# Altium PCB MiniPC.PcbDoc (part 15 of 24)
Units mm, origin at the board's own origin, x right, y up, seen from the top; angles counter-clockwise.
Board outline 175 x 155 mm, 16 copper layers (1_Top, 2_int1_(gnd), 3_int2_(power), 4_int3_(gnd), 5_int4_(sign), 6_int5_(power), 7_int6_(sign), 8_int7_(power), 9_int8_(gnd), 10_int9_(sign), 11_int10_(gnd), 12_int11_(sign), 13_int12_(gnd), 14_int13_(power), 15_int14_(gnd), 16_Bottom), stack 2.008 mm thick; 1046 components, 837 nets, 6010 pads, 4009 vias.
Unrouted connection lines stored in the file: 564.
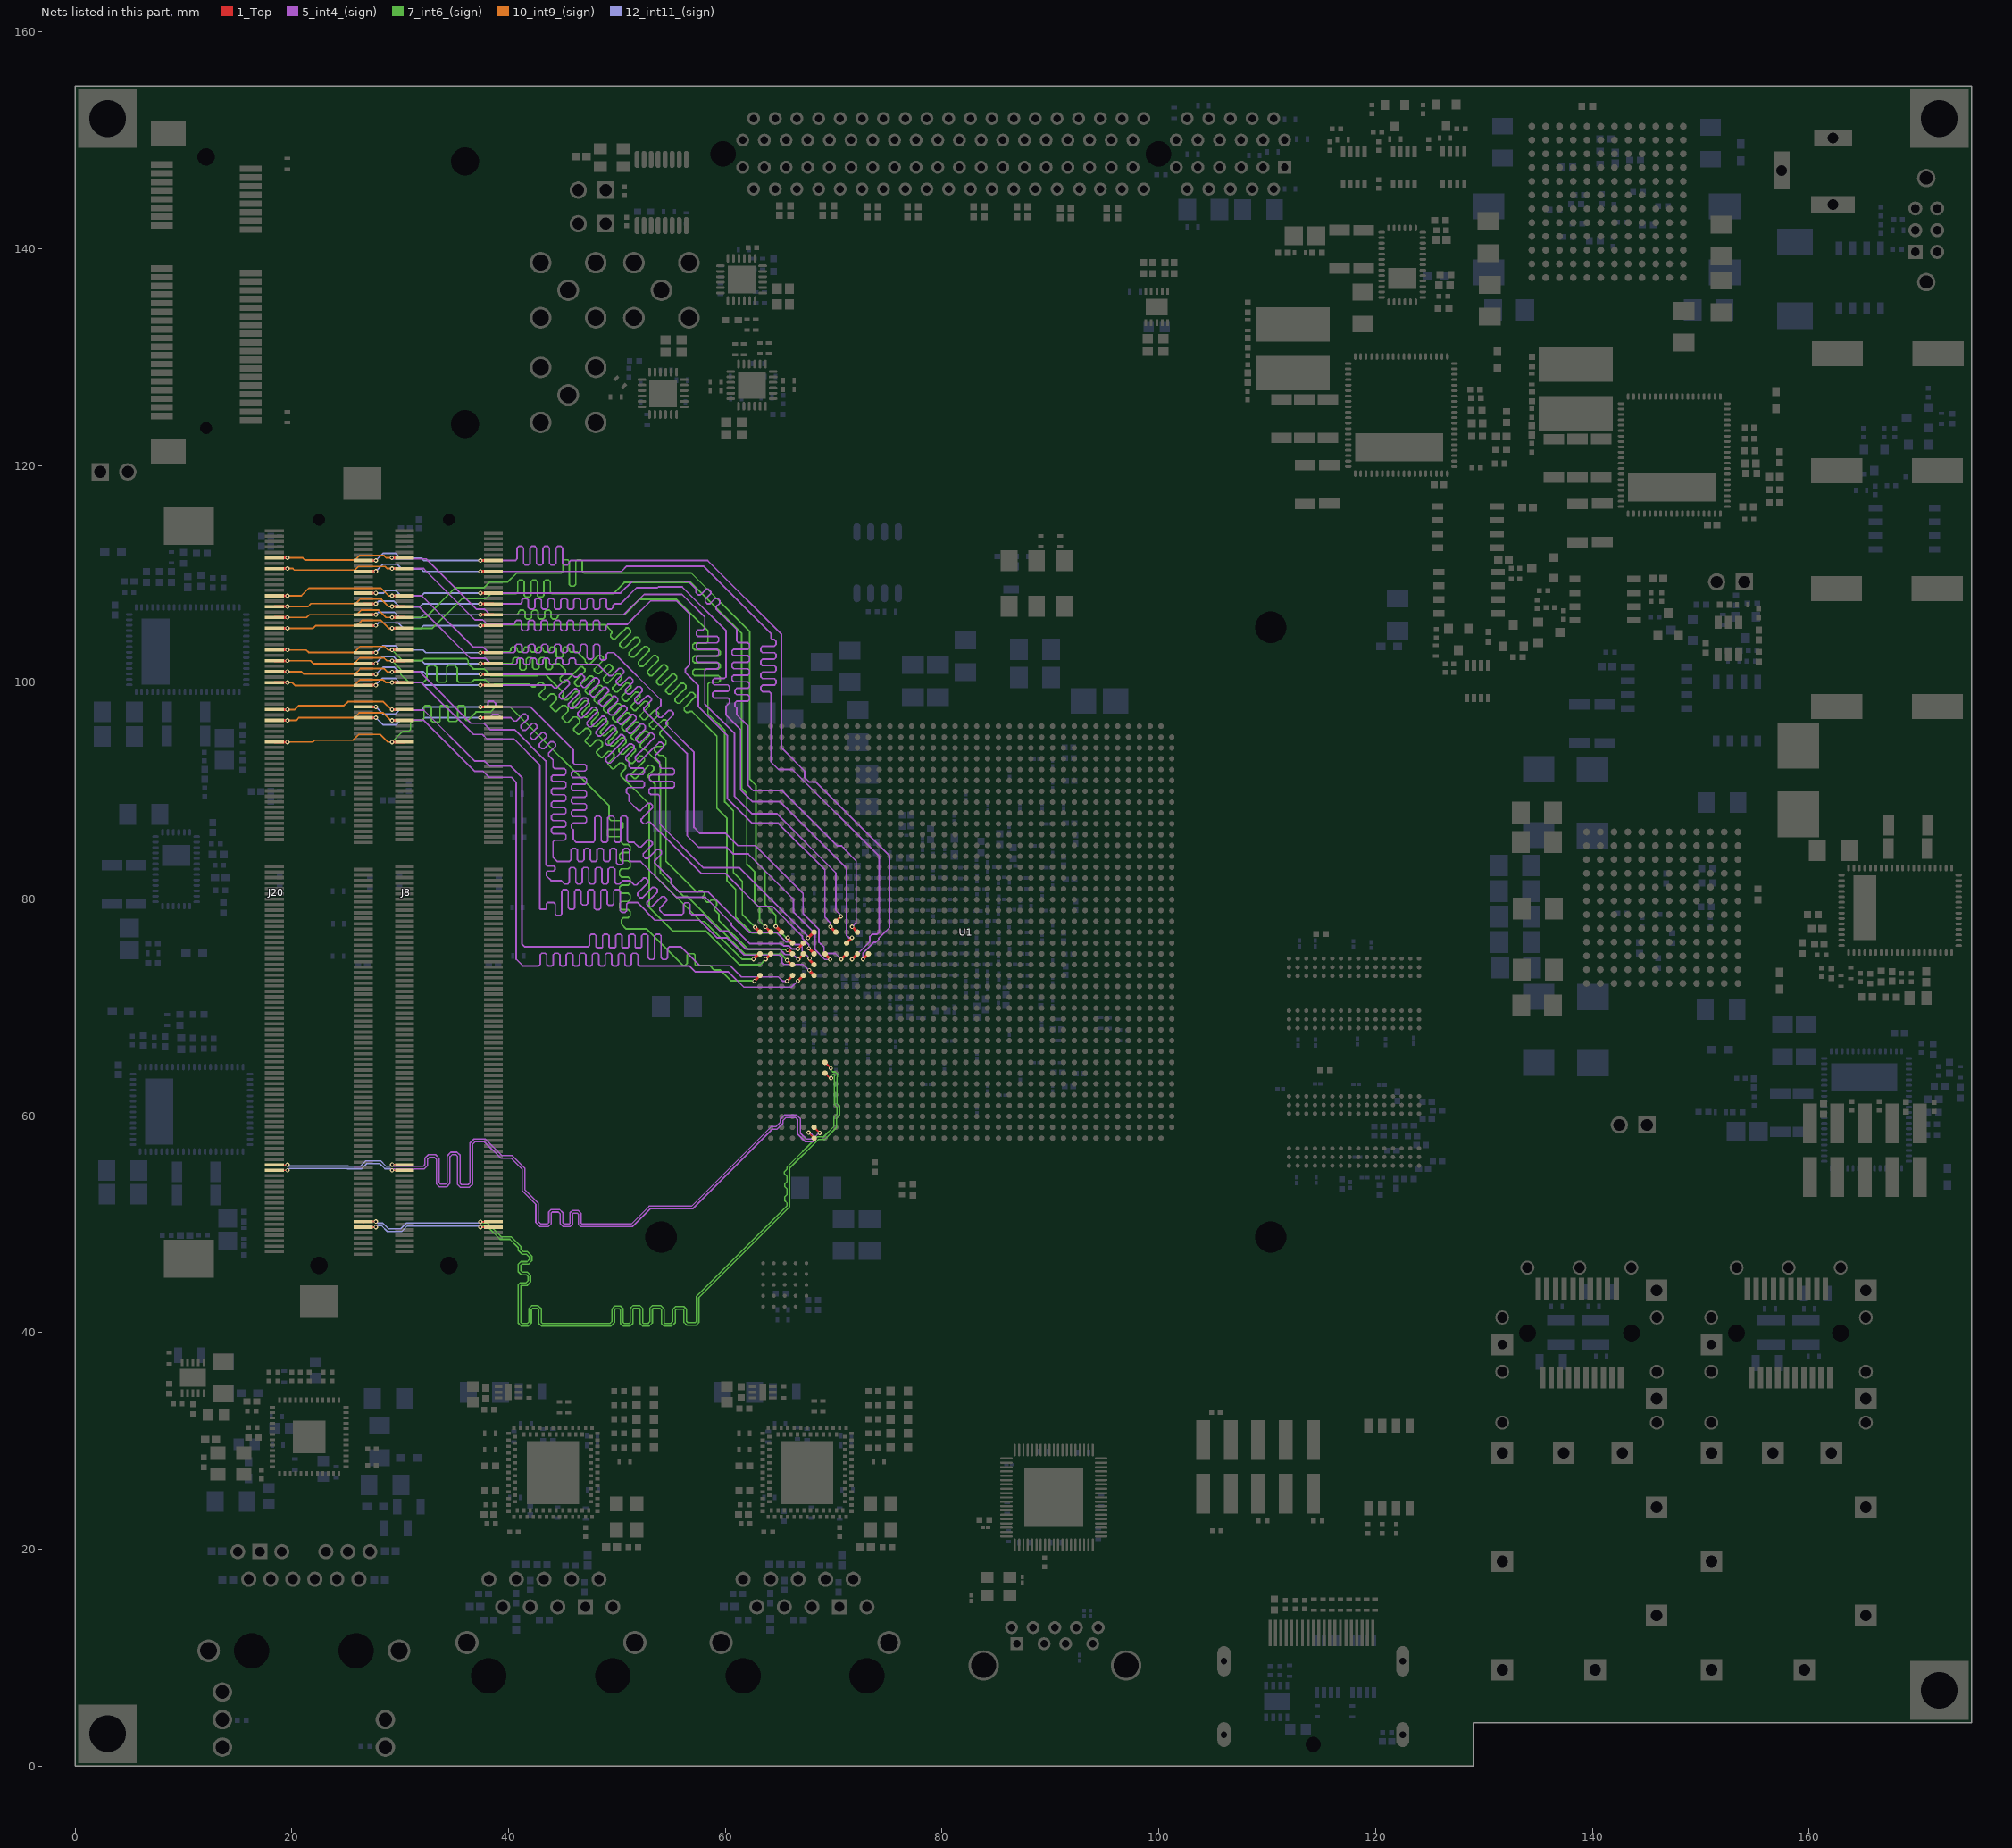
[diagram p27: the nets of this part, all layers, seen from the top]

## Via types
v1: diameter 0.4, hole 0.2, 1_Top to 16_Bottom, tented both sides, 1658 vias
v2: diameter 0.5, hole 0.2, 1_Top to 16_Bottom, tented both sides, 1014 vias
v3: diameter 0.7, hole 0.3, 1_Top to 16_Bottom, tented both sides, 915 vias
v4: diameter 0.6, hole 0.2, 1_Top to 16_Bottom, tented both sides, 278 vias
v5: diameter 0.4, hole 0.2, 1_Top to 16_Bottom, 93 vias
v6: diameter 0.4/0/0/0/0/0/0/0/0/0/0/0/0/0/0/0.4 (per signal layer), hole 0.2, 1_Top to 16_Bottom, tented both sides, 18 vias
v7: diameter 0.4/0/0/0/0/0/0/0/0/0/0/0.4/0.4/0.4/0.4/0.4 (per signal layer), hole 0.2, 1_Top to 16_Bottom, tented both sides, 16 vias
v8: diameter 0.5, hole 0.254, 1_Top to 16_Bottom, tented both sides, 15 vias
v9: diameter 0.5, hole 0.2, 1_Top to 16_Bottom, 2 vias

## Nets (pads, with @x,y where several pads share a name; then routed paths per layer and width w, separated by ;. In a path a pad name is that pad's centre, name@x,y a point inside that pad or via, vN(x,y) a via of type N, cw(c..) or ccw(c..) an arc to the next point about the centre after c; other vN are vias at no path point) (continued)
DDR4_SODIMM_DQ39: J8.182 J20.182 U1.AD1 | length 84.7
  1_Top w0.25: J20.182@18.4,94.475 v1(19.602,94.475) ; v1(29.25,94.475) J8.182@30.4,94.475 ; v1(62.675,72.425) 62.68,72.425 U1.AD1@63.194,72.939
  7_int6_(sign) w0.15: v1(29.25,94.475) 30.225,95.45 30.77,95.45 30.95,95.63 30.95,96.2 31.225,96.475 32,96.475 32.2,96.675 32.2,97.75 32.3,97.85 32.75,97.85 32.875,97.725 32.875,96.45 33,96.325 33.6,96.325 33.675,96.4 33.675,97.775 33.75,97.85 34.325,97.85 34.45,97.725 34.45,96.475 34.55,96.375 35.175,96.375 35.3,96.5 35.3,97.75 35.4,97.85 35.85,97.85 36,97.7 36,96.575 36.1,96.475 36.225,96.475 37,97.25 38.325,97.25 38.8,97.725 40.125,97.725 49.275,88.575 49.275,87.4 49.45,87.225 50.325,87.225 50.55,87 50.55,86.625 50.35,86.425 49.2,86.425 49.15,86.375 49.15,85.85 49.25,85.75 50.325,85.75 50.425,85.65 50.425,85.213 50.612,85.025 51.038,85.025 51.225,84.838 51.225,84.463 51.038,84.275 50.418,84.275 50.23,84.088 50.23,83.713 50.418,83.525 51.038,83.525 51.225,83.338 51.225,82.963 51.038,82.775 50.418,82.775 50.23,82.588 50.23,82.213 50.418,82.025 51.038,82.025 51.225,81.838 51.225,81.463 51.038,81.275 50.418,81.275 50.23,81.088 50.23,80.713 50.418,80.525 51.038,80.525 51.225,80.338 51.225,79.963 51.038,79.775 50.418,79.775 50.23,79.588 50.23,79.213 50.418,79.025 51.038,79.025 51.225,78.838 51.225,78.463 51.038,78.275 50.612,78.275 50.425,78.088 50.425,77.675 50.865,77.235 52.74,77.235 56.1,73.875 56.3,73.875 56.475,74.05 56.475,74.85 56.575,74.95 57.075,74.95 57.2,74.825 57.2,73.975 57.3,73.875 58.553,73.875 58.988,73.44 59.531,73.44 60.521,72.45 62.65,72.45 v1(62.675,72.425)
  10_int9_(sign) w0.15: v1(19.602,94.475) 21.925,94.475 22.1,94.65 25.65,94.65 26.175,95.175 28.15,95.175 28.85,94.475 v1(29.25,94.475)
DDR4_SODIMM_DQ40: J8.195 J20.195 U1.AC6 | length 89.3
  1_Top w0.25: J20.195@26.6,97.725 v1(27.75,97.725) ; v1(37.398,97.725) J8.195@38.6,97.725 ; v1(67.778,74.504) 67.778,74.355 U1.AC6@68.194,73.939
  5_int4_(sign) w0.15: v1(37.398,97.725) 37.95,97.725 37.95,97.75 38.1,97.9 38.1,98.165 38.185,98.25 38.6,98.25 38.8,98.05 38.8,97.8 38.875,97.725 42,97.725 45.985,93.74 45.985,92.55 46.135,92.4 47.035,92.4 47.185,92.25 47.185,91.95 47.035,91.8 45.96,91.8 45.81,91.65 45.81,91.35 45.96,91.2 47.035,91.2 47.185,91.05 47.185,90.75 47.035,90.6 45.96,90.6 45.81,90.45 45.81,90.15 45.96,90 47.035,90 47.185,89.85 47.185,89.55 47.035,89.4 45.96,89.4 45.81,89.25 45.81,88.95 45.96,88.8 47.035,88.8 47.185,88.65 47.185,88.35 47.035,88.2 45.96,88.2 45.81,88.05 45.81,87.75 45.96,87.6 47.035,87.6 47.185,87.45 47.185,87.15 47.035,87 45.96,87 45.81,86.85 45.81,86.55 45.985,86.375 45.985,85.49 46.25,85.225 47.8,85.225 47.95,85.375 47.95,87.5 48.1,87.65 48.4,87.65 48.55,87.5 48.55,85.375 48.7,85.225 49,85.225 49.15,85.375 49.15,87.5 49.3,87.65 49.6,87.65 49.75,87.5 49.75,85.375 49.9,85.225 50.2,85.225 50.35,85.375 50.35,87.5 50.5,87.65 50.8,87.65 50.95,87.5 50.95,85.375 51.1,85.225 51.575,85.225 51.994,84.806 52.206,84.806 52.833,85.434 53.045,85.434 53.257,85.222 53.257,85.009 52.524,84.276 52.414,84.166 52.414,83.954 52.626,83.742 52.838,83.742 53.682,84.585 53.894,84.585 54.106,84.373 54.106,84.161 53.478,83.534 53.478,83.322 54.975,81.825 54.975,81.424 55.734,80.665 57.022,80.665 58.41,80.665 61.309,77.766 61.35,77.766 62.225,76.891 64.739,76.891 65.591,76.04 66.228,76.04 66.479,75.788 66.856,75.788 67.088,75.556 67.088,75.212 67.778,74.522 v1(67.778,74.504)
  12_int11_(sign) w0.15: v1(27.75,97.725) 28.4,97.075 29.55,97.075 29.925,97.45 32,97.45 32.275,97.725 v1(37.398,97.725)
DDR4_SODIMM_DQ41: J8.194 J20.194 U1.AD4 | length 86.4
  1_Top w0.25: J20.194@18.4,97.475 v1(19.602,97.475) ; v1(29.25,97.475) J8.194@30.4,97.475 ; v1(65.7,72.425) 66.194,72.919 U1.AD4@66.194,72.939
  5_int4_(sign) w0.15: v1(29.25,97.475) 29.3,97.425 32.175,97.425 36.875,92.725 37.8,92.725 38.275,92.25 40.2,92.25 41.225,91.225 41.225,75.85 41.49,75.585 47.325,75.585 47.475,75.735 47.475,76.595 47.625,76.745 47.925,76.745 48.075,76.595 48.075,75.585 48.151,75.509 48.599,75.509 48.675,75.585 48.675,76.595 48.825,76.745 49.125,76.745 49.275,76.595 49.275,75.585 49.351,75.509 49.799,75.509 49.875,75.585 49.875,76.595 50.025,76.745 50.325,76.745 50.475,76.595 50.475,75.585 50.551,75.509 50.999,75.509 51.075,75.585 51.075,76.595 51.225,76.745 51.525,76.745 51.675,76.595 51.675,75.585 51.751,75.509 52.199,75.509 52.275,75.585 52.275,76.595 52.425,76.745 52.725,76.745 52.875,76.595 52.875,74.575 53.025,74.425 53.325,74.425 53.475,74.575 53.475,76.595 53.625,76.745 53.925,76.745 54.075,76.595 54.075,74.575 54.225,74.425 54.525,74.425 54.675,74.575 54.675,75.435 54.825,75.585 55.915,75.585 57.665,73.835 60.458,73.835 61.483,72.81 64.884,72.81 65.269,72.425 v1(65.7,72.425)
  10_int9_(sign) w0.15: v1(19.602,97.475) 20.275,97.475 20.65,97.85 24.825,97.85 25.175,98.2 28.45,98.2 29.175,97.475 v1(29.25,97.475)
DDR4_SODIMM_DQ42: J8.207 J20.207 U1.Y6 | length 90.8
  1_Top w0.25: J20.207@26.6,100.725 v1(27.75,100.725) ; v1(37.425,100.725) J8.207@38.6,100.725 ; v1(67.625,76.4) 68.164,76.939 U1.Y6@68.194,76.939
  5_int4_(sign) w0.15: v1(37.425,100.725) 45.85,100.725 46.106,100.469 46.318,100.469 46.574,100.725 46.786,100.725 46.999,100.513 46.999,100.301 46.636,99.939 46.636,99.765 46.887,99.514 47.061,99.514 47.945,100.398 48.157,100.398 48.369,100.186 48.369,99.974 47.485,99.09 47.485,98.916 47.735,98.666 47.909,98.666 48.793,99.55 49.005,99.55 49.217,99.338 49.217,99.125 48.333,98.242 48.333,98.068 48.584,97.817 48.758,97.817 49.642,98.701 49.854,98.701 50.066,98.489 50.066,98.277 49.182,97.393 49.182,97.219 49.432,96.969 49.606,96.969 50.49,97.853 50.702,97.853 50.914,97.641 50.914,97.428 50.03,96.545 50.03,96.371 50.281,96.12 50.455,96.12 51.339,97.004 51.551,97.004 51.763,96.792 51.763,96.58 50.879,95.696 50.879,95.522 51.129,95.272 51.303,95.272 52.187,96.156 52.399,96.156 52.611,95.943 52.611,95.731 51.728,94.847 51.728,94.674 51.978,94.423 52.152,94.423 53.036,95.307 53.248,95.307 53.46,95.095 53.46,94.883 52.576,93.999 51.692,93.115 51.692,92.903 51.904,92.691 52.116,92.691 53,93.575 53.884,94.459 54.096,94.459 54.308,94.246 54.308,94.034 53.531,93.256 53.531,93.044 53.95,92.625 53.95,92.2 54.1,92.05 55.155,92.05 55.305,91.9 55.305,91.6 55.155,91.45 53.149,91.45 52.999,91.3 52.999,91 53.149,90.85 55.155,90.85 55.305,90.7 55.305,90.4 55.155,90.25 53.113,90.25 52.963,90.1 52.963,89.8 53.113,89.65 53.8,89.65 53.95,89.5 53.95,86.921 57.996,82.875 61.325,82.875 67.625,76.575 v1(67.625,76.4)
  12_int11_(sign) w0.15: v1(27.75,100.725) 28.4,101.375 29.475,101.375 29.875,100.975 32.125,100.975 32.375,100.725 v1(37.425,100.725)
DDR4_SODIMM_DQ43: J8.208 J20.208 U1.AB5 | length 89.9
  1_Top w0.25: J20.208@18.4,100.975 v1(19.602,100.975) ; v1(29.25,100.95) 29.275,100.975 J8.208@30.4,100.975 ; v1(66.725,74.425) 67.194,74.894 U1.AB5@67.194,74.939
  5_int4_(sign) w0.15: v1(29.25,100.95) 29.275,100.975 31.775,100.975 36.535,96.215 37.71,96.215 38.3,95.625 40.55,95.625 43.45,92.725 43.45,83.15 43.55,83.05 44.15,83.05 44.275,82.925 44.275,82.7 44.15,82.575 43.6,82.575 43.5,82.475 43.5,82.125 43.925,81.7 44.85,81.7 45,81.55 45,81.535 45.15,81.385 45.45,81.385 45.6,81.535 45.6,82.75 45.75,82.9 46.05,82.9 46.2,82.75 46.2,81.535 46.35,81.385 46.65,81.385 46.8,81.535 46.8,82.75 46.95,82.9 47.25,82.9 47.4,82.75 47.4,81.535 47.55,81.385 47.85,81.385 48,81.535 48,82.75 48.15,82.9 48.45,82.9 48.6,82.75 48.6,81.535 48.75,81.385 49.05,81.385 49.2,81.535 49.2,82.75 49.35,82.9 49.65,82.9 49.8,82.75 49.8,81.535 49.95,81.385 50.25,81.385 50.4,81.535 50.4,81.55 50.55,81.7 51.2,81.7 51.606,81.294 51.818,81.294 52.455,81.93 52.667,81.93 52.879,81.718 52.879,81.506 51.915,80.542 51.915,80.33 52.127,80.118 52.339,80.118 53.303,81.082 53.515,81.082 53.727,80.87 53.727,80.658 52.985,79.915 52.777,79.707 52.777,79.495 52.989,79.282 53.201,79.282 53.409,79.491 54.152,80.233 54.364,80.233 54.576,80.021 54.576,79.809 53.94,79.173 53.94,78.96 54.338,78.562 56,78.562 56.15,78.712 56.15,79.495 56.3,79.645 56.6,79.645 56.75,79.495 56.75,78.712 56.9,78.562 57.988,78.562 59.525,77.025 60.25,77.025 61.9,75.375 65.021,75.375 65.521,74.875 66.25,74.875 66.7,74.425 v1(66.725,74.425)
  10_int9_(sign) w0.15: v1(19.602,100.975) 20.875,100.975 21.1,100.75 25.825,100.75 26.325,101.25 28.525,101.25 28.825,100.95 v1(29.25,100.95)
DDR4_SODIMM_DQ44: J8.191 J20.191 U1.AA5 | length 89.8
  1_Top w0.25: J20.191@26.6,96.725 v1(27.75,96.725) ; v1(37.398,96.725) J8.191@38.6,96.725 ; v1(66.7,75.4) 67.194,75.894 U1.AA5@67.194,75.939
  5_int4_(sign) w0.15: v1(37.398,96.725) 38.25,96.725 38.55,97.025 39.05,97.025 39.35,96.725 40.2,96.725 40.506,96.419 40.718,96.419 41.355,97.055 41.567,97.055 41.779,96.843 41.779,96.631 41.142,95.995 41.142,95.783 41.355,95.57 41.567,95.57 42.203,96.207 42.415,96.207 42.627,95.995 42.627,95.783 41.991,95.146 41.991,94.934 42.203,94.722 42.415,94.722 43.052,95.358 43.264,95.358 43.476,95.146 43.476,94.934 42.84,94.298 42.84,94.085 43.052,93.873 43.264,93.873 43.9,94.51 44.112,94.51 44.324,94.298 44.324,94.085 43.688,93.449 43.688,93.237 44.1,92.825 44.1,92.175 44.25,92.025 45.15,92.025 45.3,91.875 45.3,91.575 45.15,91.425 44.1,91.425 43.96,91.285 43.96,90.965 44.1,90.825 45.15,90.825 45.3,90.675 45.3,90.375 45.15,90.225 44.1,90.225 43.96,90.085 43.96,89.765 44.1,89.625 45.15,89.625 45.3,89.475 45.3,89.175 45.15,89.025 44.1,89.025 43.96,88.885 43.96,88.565 44.1,88.425 45.15,88.425 45.3,88.275 45.3,87.975 45.15,87.825 44.1,87.825 43.96,87.685 43.96,87.365 44.1,87.225 45.15,87.225 45.3,87.075 45.3,86.775 45.15,86.625 44.1,86.625 43.96,86.485 43.96,86.165 44.1,86.025 45.15,86.025 45.3,85.875 45.3,85.575 45.15,85.425 44.25,85.425 44.1,85.275 44.1,83.85 44.5,83.45 45.6,83.45 45.75,83.6 45.75,84.5 45.9,84.65 46.2,84.65 46.35,84.5 46.35,83.6 46.5,83.45 46.8,83.45 46.95,83.6 46.95,84.5 47.1,84.65 47.4,84.65 47.55,84.5 47.55,83.6 47.7,83.45 48,83.45 48.15,83.6 48.15,84.5 48.3,84.65 48.6,84.65 48.75,84.5 48.75,83.6 48.9,83.45 49.2,83.45 49.35,83.6 49.35,84.5 49.5,84.65 49.8,84.65 49.95,84.5 49.95,83.321 50.1,83.171 50.4,83.171 50.55,83.321 50.55,84.5 50.7,84.65 51,84.65 51.15,84.5 51.15,83.6 51.3,83.45 52.196,83.45 55.491,80.155 56.089,80.155 56.811,80.155 58.17,80.155 60.55,77.775 60.55,77.575 62.25,75.875 65.176,75.875 65.381,75.67 65.881,75.67 66.151,75.4 v1(66.7,75.4)
  12_int11_(sign) w0.15: v1(27.75,96.725) 28.4,96.075 29.625,96.075 30.025,96.475 32.025,96.475 32.275,96.725 v1(37.398,96.725)
DDR4_SODIMM_DQ45: J8.190 J20.190 U1.AD5 | length 86.6
  1_Top w0.25: J20.190@18.4,96.475 v1(19.602,96.475) ; v1(29.25,96.475) J8.190@30.4,96.475 ; v1(66.694,72.439) U1.AD5@67.194,72.939
  5_int4_(sign) w0.15: v1(29.25,96.475) 29.275,96.5 32.15,96.5 36.875,91.775 37.65,91.775 38.2,91.225 40.25,91.225 40.7,90.775 40.7,74.45 41.319,73.831 42.775,73.831 42.925,73.981 42.925,74.849 43.075,74.999 43.375,74.999 43.525,74.849 43.525,73.981 43.675,73.831 43.975,73.831 44.125,73.981 44.125,74.849 44.275,74.999 44.575,74.999 44.725,74.849 44.725,73.981 44.875,73.831 45.175,73.831 45.325,73.981 45.325,74.849 45.475,74.999 45.775,74.999 45.925,74.849 45.925,73.981 46.075,73.831 46.375,73.831 46.525,73.981 46.525,74.849 46.675,74.999 46.975,74.999 47.125,74.849 47.125,73.981 47.275,73.831 47.575,73.831 47.725,73.981 47.725,74.849 47.875,74.999 48.175,74.999 48.325,74.849 48.325,73.981 48.475,73.831 48.775,73.831 48.925,73.981 48.925,74.849 49.075,74.999 49.375,74.999 49.525,74.849 49.525,73.981 49.675,73.831 49.975,73.831 50.125,73.981 50.125,74.849 50.275,74.999 50.575,74.999 50.725,74.849 50.725,73.981 50.875,73.831 51.175,73.831 51.325,73.981 51.325,74.849 51.475,74.999 51.775,74.999 51.925,74.849 51.925,73.981 52.075,73.831 56.669,73.831 57.223,73.277 60.296,73.277 61.712,71.86 66.115,71.86 v1(66.694,72.439)
  10_int9_(sign) w0.15: v1(19.602,96.475) 20.4,96.475 20.65,96.725 25.75,96.725 26.2,97.175 28.45,97.175 29.15,96.475 v1(29.25,96.475)
DDR4_SODIMM_DQ46: J8.203 J20.203 U1.AB6 | length 90.2
  1_Top w0.25: J20.203@26.6,99.725 v1(27.75,99.725) ; v1(37.398,99.725) J8.203@38.6,99.725 ; v1(67.7,75.45) 68.194,74.956 U1.AB6@68.194,74.939
  5_int4_(sign) w0.15: v1(37.398,99.725) 43.975,99.725 44.231,99.469 44.443,99.469 45.189,100.215 45.401,100.215 45.614,100.003 45.614,99.791 44.682,98.859 44.682,98.647 44.894,98.435 45.106,98.435 46.07,99.398 46.282,99.398 46.494,99.186 46.494,98.974 45.61,98.09 45.53,98.011 45.53,97.798 45.743,97.586 45.955,97.586 46.034,97.666 46.918,98.55 47.13,98.55 47.342,98.338 47.342,98.125 46.458,97.242 46.379,97.162 46.379,96.95 46.591,96.738 46.803,96.738 47.767,97.701 47.979,97.701 48.191,97.489 48.191,97.277 47.307,96.393 47.227,96.314 47.227,96.101 47.44,95.889 47.652,95.889 47.731,95.969 48.615,96.853 48.827,96.853 49.039,96.641 49.039,96.428 48.155,95.545 48.076,95.465 48.076,95.253 48.288,95.041 48.5,95.041 49.464,96.004 49.676,96.004 49.888,95.792 49.888,95.58 49.004,94.696 48.925,94.616 48.925,94.404 49.137,94.192 49.349,94.192 49.428,94.272 50.312,95.156 50.524,95.156 50.736,94.943 50.736,94.731 49.853,93.847 48.969,92.964 48.969,92.751 49.181,92.539 49.393,92.539 51.161,94.307 51.373,94.307 51.585,94.095 51.585,93.883 50.807,93.105 50.807,92.893 51.125,92.575 51.125,92.225 51.275,92.075 52.375,92.075 52.525,91.925 52.525,91.625 52.375,91.475 51.02,91.475 50.87,91.325 50.87,91.025 51.02,90.875 52.375,90.875 52.525,90.725 52.525,90.425 52.375,90.275 51.02,90.275 50.87,90.125 50.87,89.825 51.125,89.57 51.125,89.025 51.981,88.169 52.193,88.169 52.86,88.835 53.072,88.835 53.284,88.623 53.284,88.411 52.511,87.639 52.243,87.371 52.243,87.158 52.456,86.946 52.668,86.946 52.83,87.108 53.042,87.108 57.785,82.365 59.985,82.365 63.05,79.3 64.369,79.3 67.095,76.574 67.095,76.38 67.7,75.775 v1(67.7,75.45)
  12_int11_(sign) w0.15: v1(27.75,99.725) 27.75,99.775 28.325,100.35 29.575,100.35 29.95,99.975 31.975,99.975 32.225,99.725 v1(37.398,99.725)
DDR4_SODIMM_DQ47: J8.204 J20.204 U1.AD6 | length 89
  1_Top w0.25: J20.204@18.4,99.975 v1(19.602,99.975) ; v1(29.25,99.975) J8.204@30.4,99.975 ; v1(67.75,73.425) 67.75,73.383 U1.AD6@68.194,72.939
  5_int4_(sign) w0.15: v1(29.25,99.975) 31.95,99.975 36.75,95.175 37.6,95.175 38.025,94.75 40.5,94.75 42.875,92.375 42.875,79.125 42.95,79.05 43.4,79.05 43.475,79.125 43.475,79.525 43.625,79.675 44.15,79.675 44.3,79.525 44.3,78.625 44.45,78.475 44.75,78.475 44.9,78.625 44.9,80.725 45.05,80.875 45.35,80.875 45.5,80.725 45.5,79.196 45.65,79.046 45.95,79.046 46.1,79.196 46.1,80.725 46.25,80.875 46.55,80.875 46.7,80.725 46.7,79.59 46.85,79.44 47.15,79.44 47.3,79.59 47.3,80.725 47.45,80.875 47.75,80.875 47.9,80.725 47.9,79.171 48.05,79.021 48.35,79.021 48.5,79.171 48.5,80.725 48.65,80.875 48.95,80.875 49.1,80.725 49.1,79.565 49.25,79.415 49.55,79.415 49.7,79.565 49.7,80.725 49.85,80.875 50.15,80.875 50.3,80.725 50.3,78.921 50.45,78.771 50.75,78.771 50.9,78.921 50.9,79.525 51.05,79.675 51.875,79.675 53.498,78.052 57.598,78.052 59.225,76.425 60.125,76.425 61.715,74.835 64.965,74.835 65.2,74.6 65.2,74.175 65.41,73.965 67.148,73.965 67.688,73.425 v1(67.75,73.425)
  10_int9_(sign) w0.15: v1(19.602,99.975) 20.025,99.975 20.3,99.7 25.75,99.7 26.275,100.225 28.45,100.225 28.7,99.975 v1(29.25,99.975)
DDR4_SODIMM_DQ48: J8.216 J20.216 U1.AB1 | length 84.7
  1_Top w0.25: J20.216@18.4,102.975 v1(19.602,102.975) ; v1(29.25,102.975) J8.216@30.4,102.975 ; v1(62.6,74.45) 63.089,74.939 U1.AB1@63.194,74.939
  7_int6_(sign) w0.15: v1(29.25,102.975) 30.225,102 32.05,102 32.225,102.175 36.1,102.175 36.275,102 36.275,101.7 36.75,101.225 37.75,101.225 38.365,100.61 42.644,100.61 42.724,100.69 43.412,100.69 45.048,99.054 45.048,98.842 44.993,98.787 44.993,98.575 45.205,98.363 45.417,98.363 45.578,98.524 46.179,99.125 46.391,99.125 46.604,98.913 46.604,98.701 45.935,98.032 45.935,97.82 46.148,97.608 46.36,97.608 47.028,98.276 47.24,98.276 47.452,98.064 47.452,97.852 46.801,97.201 46.801,96.989 47.013,96.777 47.226,96.777 47.876,97.428 48.089,97.428 48.301,97.216 48.301,97.004 47.65,96.353 47.65,96.141 47.862,95.929 48.074,95.929 48.124,95.978 48.725,96.579 48.937,96.579 49.149,96.367 49.149,96.155 48.495,95.501 48.495,95.289 48.707,95.077 48.919,95.077 49.573,95.731 49.786,95.731 49.998,95.519 49.998,95.307 49.397,94.706 49.236,94.545 49.236,94.333 49.448,94.12 49.66,94.12 49.821,94.281 50.422,94.882 50.634,94.882 50.846,94.67 50.846,94.458 50.178,93.79 50.178,93.578 50.39,93.366 50.602,93.366 51.27,94.034 51.483,94.034 51.695,93.822 51.695,93.609 51.044,92.959 51.044,92.747 51.256,92.534 51.468,92.534 51.518,92.584 52.119,93.185 52.331,93.185 52.543,92.973 52.543,92.761 51.341,91.559 51.341,91.347 51.553,91.135 51.765,91.135 52.968,92.337 53.18,92.337 53.392,92.125 53.392,91.912 52.897,91.417 52.897,91.205 53.5,90.602 53.5,82.178 57.755,77.922 58.05,77.922 61.522,74.45 v1(62.6,74.45)
  10_int9_(sign) w0.15: v1(19.602,102.975) 21.325,102.975 21.55,102.75 25.75,102.75 26.3,103.3 28.55,103.3 28.875,102.975 v1(29.25,102.975)
DDR4_SODIMM_DQ49: J8.215 J20.215 U1.AB4 | length 87.2
  1_Top w0.25: J20.215@26.6,102.725 26.625,102.7 26.655,102.73 v1(27.751,102.73) ; v1(37.398,102.725) J8.215@38.6,102.725 ; v1(65.728,75.279) 65.855,75.279 U1.AB4@66.194,74.939
  7_int6_(sign) w0.15: v1(37.398,102.725) 37.448,102.775 40.05,102.775 40.2,102.925 40.2,103.1 40.35,103.25 40.65,103.25 40.8,103.1 40.8,102.925 40.95,102.775 41.25,102.775 41.4,102.925 41.4,103.1 41.55,103.25 41.85,103.25 42,103.1 42,102.925 42.15,102.775 42.45,102.775 42.6,102.925 42.6,103.1 42.75,103.25 43.05,103.25 43.2,103.1 43.2,102.925 43.35,102.775 43.65,102.775 43.8,102.925 43.8,103.1 43.95,103.25 44.25,103.25 44.4,103.1 44.4,102.385 44.55,102.235 44.85,102.235 45,102.385 45,103.1 45.15,103.25 45.45,103.25 45.6,103.1 45.6,102.925 45.75,102.775 46.35,102.775 47.061,102.064 47.061,101.904 47.326,101.639 47.486,101.639 48.314,102.468 48.526,102.468 48.738,102.256 48.738,102.043 47.91,101.215 47.91,101.055 48.174,100.791 48.334,100.791 49.163,101.619 49.375,101.619 49.587,101.407 49.587,101.195 48.758,100.367 48.758,100.207 49.023,99.942 49.183,99.942 50.011,100.771 50.223,100.771 50.435,100.559 50.435,100.346 49.607,99.518 49.607,99.358 49.871,99.094 50.031,99.094 50.86,99.922 51.072,99.922 51.284,99.71 51.284,99.498 50.455,98.67 50.455,98.51 50.72,98.245 50.88,98.245 51.708,99.074 51.92,99.074 52.132,98.861 52.132,98.649 51.304,97.821 51.304,97.661 51.568,97.397 51.728,97.397 52.557,98.225 52.769,98.225 52.981,98.013 52.981,97.801 52.153,96.972 52.153,96.813 52.417,96.548 52.577,96.548 53.405,97.377 53.617,97.377 53.829,97.164 53.829,96.952 53.001,96.124 53.001,95.964 53.265,95.7 53.425,95.7 54.254,96.528 54.466,96.528 54.678,96.316 54.678,96.104 53.956,95.381 53.956,95.169 54.52,94.605 54.52,94.325 54.27,94.075 53.675,94.075 53.45,93.85 53.45,93.7 53.9,93.25 54.25,93.25 54.52,92.98 54.52,83.487 57.366,80.641 57.441,80.641 57.575,80.775 57.875,80.775 58.075,80.575 58.075,80.4 57.925,80.25 57.925,80.082 58.307,79.7 58.5,79.7 58.725,79.925 59.025,79.925 59.2,79.75 59.2,79.425 59,79.225 59,79.007 59.4,78.607 59.4,78.053 62.103,75.35 65.657,75.35 v1(65.728,75.279)
  12_int11_(sign) w0.15: v1(27.751,102.73) 28.371,103.35 29.6,103.35 29.975,102.975 32.1,102.975 32.35,102.725 v1(37.398,102.725)
DDR4_SODIMM_DQ50: J8.228 J20.228 U1.Y3 | length 85
  1_Top w0.25: J20.228@18.4,105.975 v1(19.602,105.975) ; v1(29.25,105.975) J8.228@30.4,105.975 ; v1(64.65,77.475) 64.658,77.475 U1.Y3@65.194,76.939
  7_int6_(sign) w0.15: v1(29.25,105.975) 32.35,105.975 35.1,108.725 37.75,108.725 38.25,109.225 39.9,109.225 40.75,110.075 44.7,110.075 44.85,110.075 45,110.225 45,111.144 45.15,111.294 45.45,111.294 45.6,111.144 45.6,110.075 45.6,109.016 45.75,108.866 46.05,108.866 46.2,109.016 46.2,110.075 46.2,111.144 46.35,111.294 46.65,111.294 46.8,111.144 46.8,110.225 46.95,110.075 48.475,110.075 56.85,110.075 62.25,104.675 62.25,91.05 62.825,90.475 62.825,83.425 63.638,82.612 63.638,79.513 64.65,78.5 v1(64.65,77.475)
  10_int9_(sign) w0.15: v1(19.602,105.975) 21.375,105.975 21.625,106.225 25.975,106.225 26.4,106.65 28.025,106.65 28.7,105.975 v1(29.25,105.975)
DDR4_SODIMM_DQ51: J8.229 J20.229 U1.Y1 | length 82.5
  1_Top w0.25: J20.229@26.6,106.225 26.625,106.2 26.655,106.23 v1(27.751,106.23) ; v1(37.398,106.225) J8.229@38.6,106.225 ; v1(62.75,77.4) 62.75,77.383 U1.Y1@63.194,76.939
  7_int6_(sign) w0.15: v1(37.398,106.225) 40.625,106.225 40.775,106.225 40.925,106.375 40.925,106.493 41.075,106.643 41.375,106.643 41.525,106.493 41.525,106.225 41.525,105.982 41.675,105.832 41.975,105.832 42.125,105.982 42.125,106.225 42.125,106.493 42.275,106.643 42.575,106.643 42.725,106.493 42.725,106.225 42.725,105.982 42.875,105.832 43.175,105.832 43.325,105.982 43.325,106.225 43.325,106.493 43.475,106.643 43.775,106.643 43.925,106.493 43.925,106.225 43.925,105.982 44.075,105.832 44.375,105.832 44.525,105.982 44.525,106.075 44.675,106.225 45.275,106.225 50.675,106.225 52.1,107.65 55.475,107.65 58.4,104.725 58.4,104.5 58.4,104.2 58.4,103.75 58.25,103.6 57.15,103.6 57,103.45 57,103.15 57.15,103 58.4,103 59.365,103 59.515,102.85 59.515,102.55 59.365,102.4 58.4,102.4 57.15,102.4 57,102.25 57,101.95 57.15,101.8 58.4,101.8 59.365,101.8 59.515,101.65 59.515,101.35 59.365,101.2 58.4,101.2 57.15,101.2 57,101.05 57,100.75 57.15,100.6 58.4,100.6 59.365,100.6 59.515,100.45 59.515,100.15 59.365,100 58.55,100 58.4,99.85 58.4,99.4 58.4,99.025 58.4,98.725 58.4,98.125 58.4,97.525 58.4,97.425 58.4,97.1 59.95,95.55 59.95,88.95 60.75,88.15 60.75,82.45 61.574,81.626 61.574,78.576 v1(62.75,77.4)
  12_int11_(sign) w0.15: v1(27.751,106.23) 27.971,106.45 29.475,106.45 29.975,105.95 31.875,105.95 32.15,106.225 v1(37.398,106.225)
DDR4_SODIMM_DQ52: J8.211 J20.211 U1.AC4 | length 86.8
  1_Top w0.25: J20.211@26.6,101.725 26.625,101.7 26.655,101.73 v1(27.751,101.73) ; v1(37.398,101.725) J8.211@38.6,101.725 ; v1(65.7,74.35) 66.111,73.939 U1.AC4@66.194,73.939
  7_int6_(sign) w0.15: v1(37.398,101.725) 40.275,101.725 40.425,101.875 40.425,102.115 40.575,102.265 40.875,102.265 41.025,102.115 41.025,101.27 41.175,101.12 41.475,101.12 41.625,101.27 41.625,102.115 41.775,102.265 42.075,102.265 42.225,102.115 42.225,101.348 42.375,101.198 42.675,101.198 42.825,101.348 42.825,102.115 42.975,102.265 43.275,102.265 43.425,102.115 43.425,101.323 43.575,101.173 43.875,101.173 44.025,101.323 44.025,101.575 44.175,101.725 44.65,101.725 45.255,101.12 45.255,100.908 44.76,100.413 44.76,100.2 44.972,99.988 45.185,99.988 45.786,100.589 46.614,101.418 46.826,101.418 47.038,101.206 47.038,100.993 46.21,100.165 46.104,100.059 46.104,99.847 46.316,99.635 46.528,99.635 46.634,99.741 47.463,100.569 47.675,100.569 47.887,100.357 47.887,100.145 47.058,99.317 47.058,99.143 47.31,98.892 47.483,98.892 48.311,99.721 48.523,99.721 48.735,99.509 48.735,99.296 47.907,98.468 47.907,98.295 48.158,98.044 48.331,98.044 49.16,98.872 49.372,98.872 49.584,98.66 49.584,98.448 48.756,97.619 48.756,97.446 49.007,97.195 49.18,97.195 50.008,98.024 50.22,98.024 50.432,97.811 50.432,97.599 49.604,96.771 49.604,96.598 49.855,96.347 50.028,96.347 50.857,97.175 51.069,97.175 51.281,96.963 51.281,96.751 50.453,95.922 50.453,95.749 50.704,95.498 50.877,95.498 51.705,96.327 51.917,96.327 52.129,96.114 52.129,95.902 51.301,95.074 51.301,94.901 51.552,94.65 51.725,94.65 52.554,95.478 52.766,95.478 52.978,95.266 52.978,95.054 52.15,94.225 52.15,94.052 52.401,93.801 52.574,93.801 54.01,92.365 54.01,91.71 53.875,91.575 53.875,90.96 54.01,90.825 54.01,82.389 56.163,80.236 56.489,80.236 61.816,74.909 65.141,74.909 v1(65.7,74.35)
  12_int11_(sign) w0.15: v1(27.751,101.73) 28.371,102.35 29.405,102.35 29.78,101.975 32,101.975 32.25,101.725 v1(37.398,101.725)
DDR4_SODIMM_DQ53: J8.212 J20.212 U1.AB2 | length 84.6
  1_Top w0.25: J20.212@18.4,101.975 v1(19.602,101.975) ; v1(29.25,101.975) J8.212@30.4,101.975 ; v1(63.725,74.45) 63.725,74.47 U1.AB2@64.194,74.939
  7_int6_(sign) w0.15: v1(29.25,101.975) 30.05,101.175 30.05,100.725 30.775,100 32.15,100 32.45,100.3 32.45,101.35 32.675,101.575 33.15,101.575 33.375,101.35 33.375,100.175 33.55,100 34.15,100 34.3,100.15 34.3,101.4 34.5,101.6 34.975,101.6 35.25,101.325 35.25,100.15 35.4,100 36.575,100 36.8,100.225 37.875,100.225 38.26,99.84 41.885,99.84 42.158,99.567 42.423,99.567 42.83,99.974 43.095,99.974 43.36,99.709 43.36,99.444 42.82,98.905 42.82,98.773 43.219,98.374 43.351,98.374 43.89,98.914 44.156,98.914 44.421,98.649 44.421,98.383 43.881,97.844 43.881,97.712 44.28,97.314 44.411,97.314 44.951,97.853 45.216,97.853 45.481,97.588 45.481,97.323 44.942,96.783 44.942,96.652 45.341,96.253 45.472,96.253 46.012,96.792 46.277,96.792 46.542,96.527 46.542,96.262 46.002,95.723 46.002,95.591 46.401,95.192 46.533,95.192 47.072,95.732 47.338,95.732 47.603,95.467 47.603,95.201 47.063,94.662 47.063,94.53 47.462,94.132 47.593,94.132 48.133,94.671 48.398,94.671 48.663,94.406 48.663,94.141 48.124,93.601 48.124,93.47 48.523,93.071 48.654,93.071 49.194,93.61 49.459,93.61 49.724,93.345 49.724,93.08 49.184,92.541 49.184,92.409 49.583,92.01 49.715,92.01 50.254,92.55 50.52,92.55 50.785,92.285 50.785,92.02 50.378,91.612 50.378,91.347 52.99,88.735 52.99,79.21 55.149,77.051 58.201,77.051 61.311,73.94 63.215,73.94 v1(63.725,74.45)
  10_int9_(sign) w0.15: v1(19.602,101.975) 21.725,101.975 22,101.7 25.725,101.7 26.275,102.25 28.5,102.25 28.775,101.975 v1(29.25,101.975)
DDR4_SODIMM_DQ54: J8.224 J20.224 U1.Y2 | length 84.9
  1_Top w0.25: J20.224@18.4,104.975 v1(19.602,104.975) ; v1(29.25,104.975) J8.224@30.4,104.975 ; v1(63.694,77.439) U1.Y2@64.194,76.939
  7_int6_(sign) w0.15: v1(29.25,104.975) 32.975,104.975 35.725,107.725 37.925,107.725 38.375,108.175 40.55,108.175 40.7,108.175 40.85,108.325 40.85,109.259 41,109.409 41.3,109.409 41.45,109.259 41.45,108.175 41.45,107.991 41.6,107.841 41.9,107.841 42.05,107.991 42.05,108.175 42.05,109.259 42.2,109.409 42.5,109.409 42.65,109.259 42.65,108.175 42.65,107.991 42.8,107.841 43.1,107.841 43.25,107.991 43.25,108.175 43.25,109.259 43.4,109.409 43.7,109.409 43.85,109.259 43.85,108.325 44,108.175 45.675,108.175 49.65,108.175 50.675,109.2 56.825,109.2 61.5,104.525 61.5,90.225 61.975,89.75 61.975,83.225 62.713,82.487 62.713,79.613 63.15,79.175 63.15,77.983 v1(63.694,77.439)
  10_int9_(sign) w0.15: v1(19.602,104.975) 21.975,104.975 22.225,105.225 25.975,105.225 26.45,105.7 28.225,105.7 28.95,104.975 v1(29.25,104.975)
DDR4_SODIMM_DQ55: J8.225 J20.225 U1.AA4 | length 87.3
  1_Top w0.25: J20.225@26.6,105.225 26.625,105.2 26.655,105.23 v1(27.751,105.23) ; v1(37.398,105.225) J8.225@38.6,105.225 ; v1(65.75,76.425) 65.75,76.383 U1.AA4@66.194,75.939
  7_int6_(sign) w0.15: v1(37.398,105.225) 37.473,105.3 48.925,105.3 49.505,104.72 49.505,104.508 49.421,104.423 49.421,104.211 49.633,103.999 49.845,103.999 50.036,104.189 50.845,104.998 51.057,104.998 51.269,104.786 51.269,104.574 50.46,103.765 50.271,103.576 50.271,103.364 50.483,103.152 50.695,103.152 50.884,103.341 51.693,104.15 51.905,104.15 52.117,103.938 52.117,103.725 51.308,102.917 51.12,102.728 51.12,102.516 51.332,102.304 51.544,102.304 52.542,103.301 52.754,103.301 52.966,103.089 52.966,102.877 52.157,102.068 51.968,101.879 51.968,101.667 52.18,101.455 52.393,101.455 52.581,101.644 53.39,102.453 53.602,102.453 53.814,102.241 53.814,102.028 53.005,101.22 52.817,101.031 52.817,100.819 53.029,100.607 53.241,100.607 54.239,101.604 54.451,101.604 54.663,101.392 54.663,101.18 53.854,100.371 53.665,100.182 53.665,99.97 53.877,99.758 54.09,99.758 54.278,99.947 55.087,100.756 55.299,100.756 55.511,100.543 55.511,100.331 54.703,99.522 54.514,99.334 54.514,99.122 54.726,98.909 54.938,98.909 55.127,99.098 55.936,99.907 56.148,99.907 56.36,99.695 56.36,99.483 55.551,98.674 55.362,98.485 55.362,98.273 55.574,98.061 55.787,98.061 55.975,98.25 56.784,99.059 56.996,99.059 57.209,98.846 57.209,98.634 56.4,97.825 56.211,97.637 56.211,97.425 56.423,97.212 56.635,97.212 56.718,97.295 56.93,97.295 59.225,95 59.225,88.375 60.15,87.45 60.15,81.675 60.95,80.875 60.95,78.35 62.425,76.875 65.15,76.875 65.6,76.425 v1(65.75,76.425)
  12_int11_(sign) w0.15: v1(27.751,105.23) 27.996,105.475 29.8,105.475 30.325,104.95 31.9,104.95 32.175,105.225 v1(37.398,105.225)
DDR4_SODIMM_DQ56: J8.237 J20.237 U1.Y10 | length 89.3
  1_Top w0.25: J20.237@26.6,108.225 v1(27.75,108.225) ; v1(37.398,108.225) J8.237@38.6,108.225 ; v1(71.694,77.439) U1.Y10@72.194,76.939
  5_int4_(sign) w0.15: v1(37.398,108.225) 50.336,108.225 51.421,109.31 56.232,109.31 56.242,109.3 56.6,109.3 56.713,109.188 56.925,108.975 57.276,108.624 57.276,108.478 57.276,108.266 57.488,108.054 57.7,108.054 57.773,108.127 58.226,108.58 58.438,108.58 58.65,108.368 58.65,108.155 58.197,107.703 58.143,107.648 58.143,107.436 58.355,107.224 58.567,107.224 58.622,107.278 59.075,107.731 59.287,107.731 59.499,107.519 59.499,107.307 59.152,106.96 59.152,106.748 60.187,105.713 61.05,104.85 61.05,104.45 61.05,103.792 61.2,103.642 62.075,103.642 62.225,103.492 62.225,103.192 62.075,103.042 61.05,103.042 60.775,103.042 60.625,102.892 60.625,102.592 60.775,102.442 61.05,102.442 62.075,102.442 62.225,102.292 62.225,101.992 62.075,101.842 61.05,101.842 60.775,101.842 60.625,101.692 60.625,101.392 60.775,101.242 61.05,101.242 62.075,101.242 62.225,101.092 62.225,100.792 62.075,100.642 61.05,100.642 60.775,100.642 60.625,100.492 60.625,100.192 60.775,100.042 61.05,100.042 62.075,100.042 62.225,99.892 62.225,99.592 62.075,99.442 61.05,99.442 60.9,99.292 60.9,98.992 61.05,98.842 62.075,98.842 62.225,98.692 62.225,98.392 62.075,98.242 61.05,98.242 61.039,98.242 60.889,98.092 60.889,97.792 61.039,97.642 61.05,97.631 61.05,97.342 61.05,97 62.1,95.95 62.1,90.475 62.575,90 65.225,90 70.325,84.9 70.73,84.9 70.95,84.68 70.95,84.63 72.079,83.501 72.079,77.824 v1(71.694,77.439)
  12_int11_(sign) w0.15: v1(27.75,108.225) 28.475,108.225 28.7,108.45 29.6,108.45 30.1,107.95 31.95,107.95 32.225,108.225 v1(37.398,108.225)
DDR4_SODIMM_DQ57: J8.236 J20.236 U1.AB9 | length 88.9
  1_Top w0.25: J20.236@18.4,107.975 v1(19.602,107.975) ; v1(29.25,107.975) J8.236@30.4,107.975 ; v1(70.694,74.439) U1.AB9@71.194,74.939
  5_int4_(sign) w0.15: v1(29.25,107.975) 32,107.975 36.75,103.225 37.675,103.225 38.175,102.725 40.475,102.725 40.625,102.875 40.625,103.35 40.775,103.5 41.075,103.5 41.225,103.35 41.225,102.875 41.375,102.725 41.675,102.725 41.825,102.875 41.825,103.35 41.975,103.5 42.275,103.5 42.425,103.35 42.425,102.875 42.575,102.725 42.875,102.725 43.025,102.875 43.025,103.35 43.175,103.5 43.475,103.5 43.625,103.35 43.625,102.875 43.775,102.725 44.075,102.725 44.225,102.875 44.225,103.35 44.375,103.5 44.675,103.5 44.825,103.35 44.825,102.875 44.975,102.725 45.275,102.725 45.425,102.875 45.425,103.35 45.575,103.5 45.875,103.5 46.025,103.35 46.025,102.875 46.175,102.725 46.475,102.725 46.625,102.875 46.625,103.35 46.775,103.5 47.075,103.5 47.225,103.35 47.225,102.285 47.375,102.135 47.675,102.135 47.825,102.285 47.825,103.35 47.975,103.5 48.275,103.5 48.425,103.35 48.425,102.187 48.575,102.037 48.875,102.037 49.025,102.187 49.025,102.575 49.175,102.725 49.698,102.725 54.05,98.373 54.05,97.85 53.65,97.45 53.65,97 53.906,96.744 54.118,96.744 54.771,97.396 54.983,97.396 55.195,97.184 55.195,96.972 54.542,96.32 54.542,96.108 57.1,93.55 57.1,86.6 57.65,86.05 60.025,86.05 61.15,84.925 62.75,84.925 67.175,80.5 67.175,78.675 68.625,77.225 68.625,76.03 68.805,75.85 68.83,75.85 69.1,75.58 69.1,75.15 69.275,74.975 70.158,74.975 v1(70.694,74.439)
  10_int9_(sign) w0.15: v1(19.602,107.975) 20.875,107.975 21.575,108.675 28.225,108.675 28.925,107.975 v1(29.25,107.975)
DDR4_SODIMM_DQ58: J8.249 J20.249 U1.AB11 | length 91.5
  1_Top w0.25: J20.249@26.6,111.225 26.625,111.2 26.655,111.23 v1(27.751,111.23) ; v1(37.398,111.225) J8.249@38.6,111.225 ; v1(72.694,74.439) U1.AB11@73.194,74.939
  5_int4_(sign) w0.15: v1(37.398,111.225) 40.475,111.225 40.625,111.225 40.775,111.375 40.775,112.384 40.925,112.534 41.225,112.534 41.375,112.384 41.375,111.225 41.375,110.976 41.525,110.826 41.825,110.826 41.975,110.976 41.975,111.225 41.975,112.384 42.125,112.534 42.425,112.534 42.575,112.384 42.575,111.225 42.575,110.976 42.725,110.826 43.025,110.826 43.175,110.976 43.175,111.225 43.175,112.384 43.325,112.534 43.625,112.534 43.775,112.384 43.775,111.225 43.775,110.976 43.925,110.826 44.225,110.826 44.375,110.976 44.375,111.225 44.375,112.384 44.525,112.534 44.825,112.534 44.975,112.384 44.975,111.225 44.975,110.976 45.125,110.826 45.425,110.826 45.575,110.976 45.575,111.075 45.725,111.225 47.55,111.225 58.375,111.225 65.175,104.425 65.175,93.95 67.34,91.785 67.325,91.77 67.325,91.2 67.725,90.8 68.325,90.8 75.15,83.975 75.15,77.365 74.56,76.775 74.545,76.775 74.15,76.38 74.15,76.295 73.855,76 73.695,76 72.694,74.999 v1(72.694,74.439)
  12_int11_(sign) w0.15: v1(27.751,111.23) 28.396,111.875 29.6,111.875 30.025,111.45 31.975,111.45 32.2,111.225 v1(37.398,111.225)
DDR4_SODIMM_DQ59: J8.250 J20.250 U1.W8 | length 90.9
  1_Top w0.25: J20.250@18.4,111.475 v1(19.602,111.475) ; v1(29.225,111.475) J8.250@30.4,111.475 ; U1.W8@70.194,77.939 v1(70.655,78.4)
  5_int4_(sign) w0.15: v1(29.225,111.475) 29.325,111.375 32.4,111.375 37.025,106.75 37.775,106.75 38.3,106.225 50.625,106.225 52.5,108.1 56,108.1 58.1,106 58.1,105.725 58.1,105.425 58.1,104.975 57.95,104.825 57.479,104.825 57.329,104.675 57.329,104.375 57.479,104.225 58.1,104.225 59.231,104.225 59.381,104.075 59.381,103.775 59.231,103.625 58.1,103.625 57.479,103.625 57.329,103.475 57.329,103.175 57.479,103.025 58.1,103.025 59.231,103.025 59.381,102.875 59.381,102.575 59.231,102.425 58.1,102.425 57.479,102.425 57.329,102.275 57.329,101.975 57.479,101.825 58.1,101.825 59.231,101.825 59.381,101.675 59.381,101.375 59.231,101.225 58.25,101.225 58.1,101.075 58.1,100.625 58.1,98 60.85,95.25 60.85,89.45 62.425,87.875 64.725,87.875 70.2,82.4 70.2,78.946 70.655,78.491 v1(70.655,78.4)
  10_int9_(sign) w0.15: v1(19.602,111.475) 21,111.475 21.2,111.275 25.85,111.275 26.275,111.7 28.475,111.7 28.7,111.475 v1(29.225,111.475)
DDR4_SODIMM_DQ60: J8.232 J20.232 U1.AB7 | length 86.2
  1_Top w0.25: J20.232@18.4,106.975 v1(19.602,106.975) ; v1(29.25,106.975) J8.232@30.4,106.975 ; U1.AB7@69.194,74.939 69.177,74.923 69.636,74.464 v1(69.675,74.425)
  5_int4_(sign) w0.15: v1(29.25,106.975) 31.725,106.975 36.5,102.2 37.875,102.2 38.45,101.625 40.625,101.625 40.775,101.775 40.775,102.065 40.925,102.215 41.225,102.215 41.375,102.065 41.375,101.775 41.525,101.625 41.825,101.625 41.975,101.775 41.975,102.065 42.125,102.215 42.425,102.215 42.575,102.065 42.575,101.775 42.725,101.625 43.025,101.625 43.175,101.775 43.175,102.065 43.325,102.215 43.625,102.215 43.775,102.065 43.775,101.775 43.925,101.625 44.225,101.625 44.375,101.775 44.375,102.065 44.525,102.215 44.825,102.215 44.975,102.065 44.975,101.775 45.125,101.625 45.425,101.625 45.575,101.775 45.575,102.065 45.725,102.215 46.025,102.215 46.175,102.065 46.175,101.775 46.325,101.625 48.275,101.625 49.305,100.595 49.517,100.595 50.206,101.284 50.418,101.284 50.63,101.072 50.63,100.86 49.941,100.171 49.941,99.959 50.153,99.747 50.365,99.747 51.054,100.436 51.266,100.436 51.478,100.224 51.478,100.011 50.79,99.323 50.79,99.11 51.002,98.898 51.214,98.898 51.903,99.587 52.115,99.587 52.327,99.375 52.327,99.163 51.638,98.474 51.638,98.262 51.85,98.05 52.062,98.05 52.751,98.739 52.963,98.739 53.175,98.527 53.175,98.314 52.487,97.626 52.487,97.413 56.475,93.425 56.475,85.85 57.55,84.775 60.125,84.775 60.75,84.15 62.125,84.15 66.275,80 66.275,78.825 68.275,76.825 68.275,75.32 69.17,74.425 v1(69.675,74.425)
  10_int9_(sign) w0.15: v1(19.602,106.975) 21.5,106.975 21.775,107.25 25.875,107.25 26.3,107.675 28.25,107.675 28.95,106.975 v1(29.25,106.975)
DDR4_SODIMM_DQ61: J8.233 J20.233 U1.AA9 | length 89.3
  1_Top w0.25: J20.233@26.6,107.225 26.625,107.2 26.655,107.23 v1(27.751,107.23) ; v1(37.398,107.225) J8.233@38.6,107.225 ; U1.AA9@71.194,75.939 v1(71.68,76.425)
  5_int4_(sign) w0.15: v1(37.398,107.225) 40.925,107.225 41.075,107.225 41.225,107.375 41.225,107.565 41.375,107.715 41.675,107.715 41.825,107.565 41.825,107.225 41.825,106.885 41.975,106.735 42.275,106.735 42.425,106.885 42.425,107.225 42.425,107.565 42.575,107.715 42.875,107.715 43.025,107.565 43.025,107.225 43.025,106.885 43.175,106.735 43.475,106.735 43.625,106.885 43.625,107.225 43.625,107.565 43.775,107.715 44.075,107.715 44.225,107.565 44.225,107.225 44.225,106.885 44.375,106.735 44.675,106.735 44.825,106.885 44.825,107.225 44.825,107.565 44.975,107.715 45.275,107.715 45.425,107.565 45.425,107.225 45.425,106.885 45.575,106.735 45.875,106.735 46.025,106.885 46.025,107.225 46.025,107.565 46.175,107.715 46.475,107.715 46.625,107.565 46.625,107.225 46.625,106.885 46.775,106.735 47.075,106.735 47.225,106.885 47.225,107.225 47.225,107.565 47.375,107.715 47.675,107.715 47.825,107.565 47.825,107.225 47.825,106.885 47.975,106.735 48.275,106.735 48.425,106.885 48.425,107.225 48.425,107.565 48.575,107.715 48.875,107.715 49.025,107.565 49.025,107.225 49.025,106.885 49.175,106.735 49.475,106.735 49.625,106.885 49.625,107.075 49.775,107.225 50.225,107.225 50.325,107.225 50.388,107.287 51.815,108.715 53.736,108.715 53.821,108.8 56.021,108.8 60.075,104.746 60.075,100.6 60.075,100.5 59.925,100.35 58.986,100.35 58.836,100.2 58.836,99.9 58.986,99.75 60.075,99.75 60.229,99.75 60.379,99.6 60.379,99.3 60.229,99.15 60.075,99.15 58.986,99.15 58.836,99 58.836,98.7 58.986,98.55 60.075,98.55 60.229,98.55 60.379,98.4 60.379,98.1 60.229,97.95 60.225,97.95 60.075,97.8 60.075,97.35 60.075,97.05 60.075,96.95 61.4,95.625 61.4,90.075 62.5,88.975 65.075,88.975 71.175,82.875 71.175,76.65 71.4,76.425 v1(71.68,76.425)
  12_int11_(sign) w0.15: v1(27.751,107.23) 27.996,107.475 29.425,107.475 29.95,106.95 31.8,106.95 32.075,107.225 v1(37.398,107.225)
DDR4_SODIMM_DQ62: J8.245 J20.245 U1.AB10 | length 88.5
  1_Top w0.25: J20.245@26.6,110.225 26.605,110.23 v1(27.751,110.23) ; v1(37.398,110.225) J8.245@38.6,110.225 ; v1(71.694,74.439) U1.AB10@72.194,74.939
  5_int4_(sign) w0.15: v1(37.398,110.225) 50.425,110.225 50.9,110.7 58,110.7 64.2,104.5 64.2,104.225 64.2,104.075 64.35,103.925 64.515,103.925 64.665,103.775 64.665,103.475 64.515,103.325 64.2,103.325 63.435,103.325 63.285,103.175 63.285,102.875 63.435,102.725 64.2,102.725 64.515,102.725 64.665,102.575 64.665,102.275 64.515,102.125 64.2,102.125 63.435,102.125 63.285,101.975 63.285,101.675 63.435,101.525 64.2,101.525 64.515,101.525 64.665,101.375 64.665,101.075 64.515,100.925 64.2,100.925 63.435,100.925 63.285,100.775 63.285,100.475 63.435,100.325 64.2,100.325 64.515,100.325 64.665,100.175 64.665,99.875 64.515,99.725 64.2,99.725 63.435,99.725 63.285,99.575 63.285,99.275 63.435,99.125 64.05,99.125 64.2,98.975 64.2,98.325 64.2,92.65 64.9,91.95 66.193,91.95 74.2,83.943 74.2,76.945 74.008,76.754 73.548,76.754 73.329,76.534 73.329,76.074 v1(71.694,74.439)
  12_int11_(sign) w0.15: v1(27.751,110.23) 28.396,110.875 29.725,110.875 30.15,110.45 31.925,110.45 32.15,110.225 v1(37.398,110.225)
DDR4_SODIMM_DQ63: J8.246 J20.246 U1.Y8 | length 90.9
  1_Top w0.25: J20.246@18.4,110.475 v1(19.602,110.475) ; v1(29.25,110.475) J8.246@30.4,110.475 ; v1(69.694,77.439) U1.Y8@70.194,76.939
  5_int4_(sign) w0.15: v1(29.25,110.475) 32.175,110.475 36.9,105.75 37.625,105.75 38.05,105.325 40.3,105.325 40.45,105.325 40.6,105.475 40.6,105.565 40.75,105.715 41.05,105.715 41.2,105.565 41.2,105.325 41.2,104.89 41.35,104.74 41.65,104.74 41.8,104.89 41.8,105.325 41.8,105.565 41.95,105.715 42.25,105.715 42.4,105.565 42.4,105.325 42.4,104.89 42.55,104.74 42.85,104.74 43,104.89 43,105.325 43,105.565 43.15,105.715 43.45,105.715 43.6,105.565 43.6,105.325 43.6,104.89 43.75,104.74 44.05,104.74 44.2,104.89 44.2,105.325 44.2,105.565 44.35,105.715 44.65,105.715 44.8,105.565 44.8,105.325 44.8,104.89 44.95,104.74 45.25,104.74 45.4,104.89 45.4,105.325 45.4,105.565 45.55,105.715 45.85,105.715 46,105.565 46,105.325 46,104.89 46.15,104.74 46.45,104.74 46.6,104.89 46.6,105.325 46.6,105.565 46.75,105.715 47.05,105.715 47.2,105.565 47.2,105.325 47.2,104.89 47.35,104.74 47.65,104.74 47.8,104.89 47.8,105.325 47.8,105.565 47.95,105.715 48.25,105.715 48.4,105.565 48.4,105.325 48.4,104.89 48.55,104.74 48.85,104.74 49,104.89 49,105.175 49.15,105.325 50.925,105.325 51.137,105.537 51.4,105.8 53.1,107.5 55.5,107.5 56.7,106.3 56.7,101.6 56.325,101.225 56.325,100.875 57.5,99.7 57.5,97.775 60.175,95.1 60.175,89.3 62.475,87 64.875,87 69.184,82.691 69.184,78.316 69.694,77.806 v1(69.694,77.439)
  10_int9_(sign) w0.15: v1(19.602,110.475) 20.1,110.475 20.225,110.35 25.825,110.35 26.15,110.675 28.625,110.675 28.825,110.475 v1(29.25,110.475)
DDR4_SODIMM_DQS0_N: J8.11 J20.11 U1.AM7 | length 87.8
  1_Top w0.15: J20.11@26.6,49.725 v1(27.75,49.725) ; v1(37.398,49.725) J8.11@38.6,49.725 ; U1.AM7@69.194,64.939 69.194,64.931 v1(69.725,64.4)
  7_int6_(sign) w0.13: v1(37.398,49.725) 37.525,49.725 37.675,49.875 37.951,49.875 39.216,48.61 40.126,48.61 40.885,47.851 40.885,47.601 41.251,47.235 41.64,47.235 41.9,46.975 41.9,46.725 41.725,46.55 41.136,46.55 40.885,46.299 40.885,45.626 41.176,45.335 41.64,45.335 41.81,45.165 41.81,44.799 41.611,44.6 41.086,44.6 40.885,44.399 40.885,40.876 41.151,40.61 41.701,40.61 41.835,40.61 42.1,40.875 42.1,42.1 42.235,42.235 42.651,42.235 42.785,42.101 42.785,40.851 43.026,40.61 49.449,40.61 49.765,40.926 49.765,42.09 49.875,42.2 50.225,42.2 50.325,42.1 50.325,40.85 50.565,40.61 51.224,40.61 51.465,40.851 51.465,42.14 51.56,42.235 52.05,42.235 52.125,42.16 52.125,40.836 52.351,40.61 52.974,40.61 53.265,40.901 53.265,42.165 53.335,42.235 53.975,42.235 54.125,42.085 54.125,40.811 54.326,40.61 55.074,40.61 55.39,40.926 55.39,42.05 55.515,42.175 56.075,42.175 56.187,42.063 56.187,40.949 56.451,40.685 57.324,40.685 57.55,40.911 57.55,43.225 65.94,51.615 65.94,55.176 68.584,57.82 69.159,57.82 70.265,58.926 70.265,59.776 70.54,60.051 70.54,60.899 70.315,61.125 70.315,62.269 70.31,62.274 70.31,62.576 70.315,62.581 70.315,63.244 70.31,63.249 70.31,63.551 70.315,63.556 70.315,63.576 70.34,63.602 70.34,63.867 70.149,64.057 69.9,64.057 69.725,64.233 v1(69.725,64.4)
  12_int11_(sign) w0.13: v1(27.75,49.725) 27.875,49.85 28.3,49.85 28.81,49.34 30.156,49.34 30.656,49.84 37.283,49.84 v1(37.398,49.725)
DDR4_SODIMM_DQS0_P: J8.13 J20.13 U1.AN7 | length 87.6
  1_Top w0.15: J20.13@26.6,50.225 26.65,50.175 26.727,50.252 v1(27.751,50.252) ; v1(37.398,50.225) J8.13@38.6,50.225 ; U1.AN7@69.194,63.939 69.194,63.944 69.663,63.475 v1(69.75,63.475)
  7_int6_(sign) w0.13: v1(37.398,50.225) 37.55,50.225 37.66,50.115 38.05,50.115 39.315,48.85 40.225,48.85 41.125,47.95 41.125,47.7 41.35,47.475 41.739,47.475 42.14,47.074 42.14,46.626 41.824,46.31 41.235,46.31 41.125,46.2 41.125,45.725 41.275,45.575 41.739,45.575 42.05,45.264 42.05,44.7 41.7,44.35 41.176,44.35 41.125,44.299 41.125,40.975 41.25,40.85 41.736,40.85 41.86,40.974 41.86,42.199 42.136,42.475 42.75,42.475 43.025,42.2 43.025,40.95 43.125,40.85 49.35,40.85 49.525,41.025 49.525,42.189 49.776,42.44 50.324,42.44 50.565,42.199 50.565,40.949 50.664,40.85 51.125,40.85 51.225,40.95 51.225,42.239 51.461,42.475 52.149,42.475 52.365,42.259 52.365,40.935 52.45,40.85 52.875,40.85 53.025,41 53.025,42.264 53.236,42.475 54.074,42.475 54.365,42.184 54.365,40.91 54.425,40.85 54.975,40.85 55.15,41.025 55.15,42.149 55.416,42.415 56.174,42.415 56.427,42.162 56.427,41.048 56.55,40.925 57.225,40.925 57.31,41.01 57.31,43.324 65.7,51.714 65.7,51.95 65.475,52.175 65.475,52.525 65.7,52.75 65.7,53.25 65.475,53.475 65.475,53.725 65.7,53.95 65.7,54.4 65.45,54.65 65.45,54.85 65.7,55.1 65.7,55.275 68.485,58.06 69.06,58.06 70.025,59.025 70.025,59.875 70.3,60.15 70.3,60.8 70.075,61.025 70.075,62.17 70.07,62.174 70.07,62.676 70.075,62.68 70.075,63.145 70.07,63.149 70.07,63.651 70.075,63.655 70.075,63.676 70.1,63.701 70.1,63.768 70.05,63.818 69.892,63.818 69.75,63.675 v1(69.75,63.475)
  12_int11_(sign) w0.13: v1(27.751,50.252) 27.904,50.1 27.905,50.1 27.915,50.09 28.399,50.09 28.909,49.58 30.056,49.58 30.586,50.11 37.283,50.11 v1(37.398,50.225)
DDR4_SODIMM_DQS1_N: J8.32 J20.32 U1.AV6 | length 81.6
  1_Top w0.15: J20.32@18.4,54.975 v1(19.602,54.975) ; v1(29.25,54.975) J8.32@30.4,54.975 ; U1.AV6@68.194,58.939 68.7,58.433 v1(68.7,58.425)
  5_int4_(sign) w0.13: v1(29.25,54.975) 29.385,55.11 32.235,55.11 32.525,55.4 32.525,56 32.7,56.175 33.16,56.175 33.335,56 33.335,53.74 33.615,53.46 34.284,53.46 34.575,53.751 34.575,56.2 34.775,56.4 35.15,56.4 35.285,56.265 35.285,54.926 35.285,53.676 35.551,53.41 36.369,53.41 36.549,53.59 36.604,53.59 36.682,53.668 36.682,57.382 36.91,57.61 37.766,57.61 39.276,56.1 40.235,56.1 41.25,55.085 41.25,53.1 42.51,51.84 42.51,50.151 42.886,49.775 43.674,49.775 43.95,50.051 43.95,51.05 44.025,51.125 44.6,51.125 44.76,50.965 44.76,50.051 45.036,49.775 45.689,49.775 45.915,50.001 45.915,50.951 45.999,51.035 46.326,51.035 46.435,50.926 46.435,50.001 46.661,49.775 49.749,49.775 51.425,49.775 53.072,51.422 56.987,51.422 64.325,58.76 64.766,58.76 65.309,59.303 65.309,59.533 65.31,59.534 65.31,59.576 65.558,59.824 65.949,59.824 ; 65.949,59.825 66.439,59.825 ; 66.439,59.824 66.501,59.824 66.685,59.64 66.685,58.301 67.376,57.61 68.124,57.61 68.29,57.776 68.29,57.966 68.308,57.984 68.308,58.083 68.649,58.425 v1(68.7,58.425)
  12_int11_(sign) w0.13: v1(19.602,54.975) 19.75,55.123 19.75,55.125 25.119,55.125 25.124,55.12 26.445,55.12 26.915,55.59 28.11,55.59 28.581,55.119 29.106,55.119 v1(29.25,54.975)
DDR4_SODIMM_DQS1_P: J8.34 J20.34 U1.AW6 | length 82.2
  1_Top w0.15: J20.34@18.4,55.475 v1(19.602,55.475) ; v1(29.251,55.503) 30.372,55.503 J8.34@30.4,55.475 ; v1(67.675,58.45) 67.683,58.45 U1.AW6@68.194,57.939
  5_int4_(sign) w0.13: v1(29.251,55.503) 29.251,55.474 29.375,55.35 32.136,55.35 32.285,55.499 32.285,56.099 32.601,56.415 33.259,56.415 33.575,56.099 33.575,53.839 33.714,53.7 34.185,53.7 34.335,53.85 34.335,56.299 34.676,56.64 35.249,56.64 35.525,56.364 35.525,53.775 35.65,53.65 36.269,53.65 36.442,53.823 36.442,57.482 36.811,57.85 37.865,57.85 39.375,56.34 40.334,56.34 41.49,55.184 41.49,53.199 42.75,51.939 42.75,50.25 42.985,50.015 43.575,50.015 43.71,50.15 43.71,51.149 43.926,51.365 44.699,51.365 45,51.064 45,50.15 45.135,50.015 45.59,50.015 45.675,50.1 45.675,51.05 45.9,51.275 46.425,51.275 46.675,51.025 46.675,50.1 46.76,50.015 50.456,50.015 ; 49.65,50.015 50.456,50.015 ; 65.849,60.064 65.459,60.064 65.07,59.676 65.07,59.634 65.069,59.633 65.069,59.403 64.666,59 64.226,59 56.888,51.662 52.973,51.662 51.326,50.015 50.456,50.015 ; 65.85,60.065 66.538,60.065 ; 66.539,60.064 66.6,60.064 66.925,59.739 66.925,58.4 67.475,57.85 68.025,57.85 68.05,57.875 68.05,58.225 67.75,58.525 v1(67.675,58.45)
  12_int11_(sign) w0.13: v1(19.602,55.475) 19.712,55.365 25.219,55.365 25.224,55.36 26.346,55.36 26.816,55.83 28.209,55.83 28.681,55.359 29.108,55.359 v1(29.251,55.503)